# Altium PCB ODOS_PDB_prop_pcb.PcbDoc
Units mm, origin at the board's own origin, x right, y up, seen from the top; angles counter-clockwise.
Board outline 83.75 x 65.89 mm, 4 copper layers (Top Layer, Mid Layer 1, Mid Layer 2, Bottom Layer), stack 1.685 mm thick; 16 components, 2 nets, 37 pads, 149 vias.
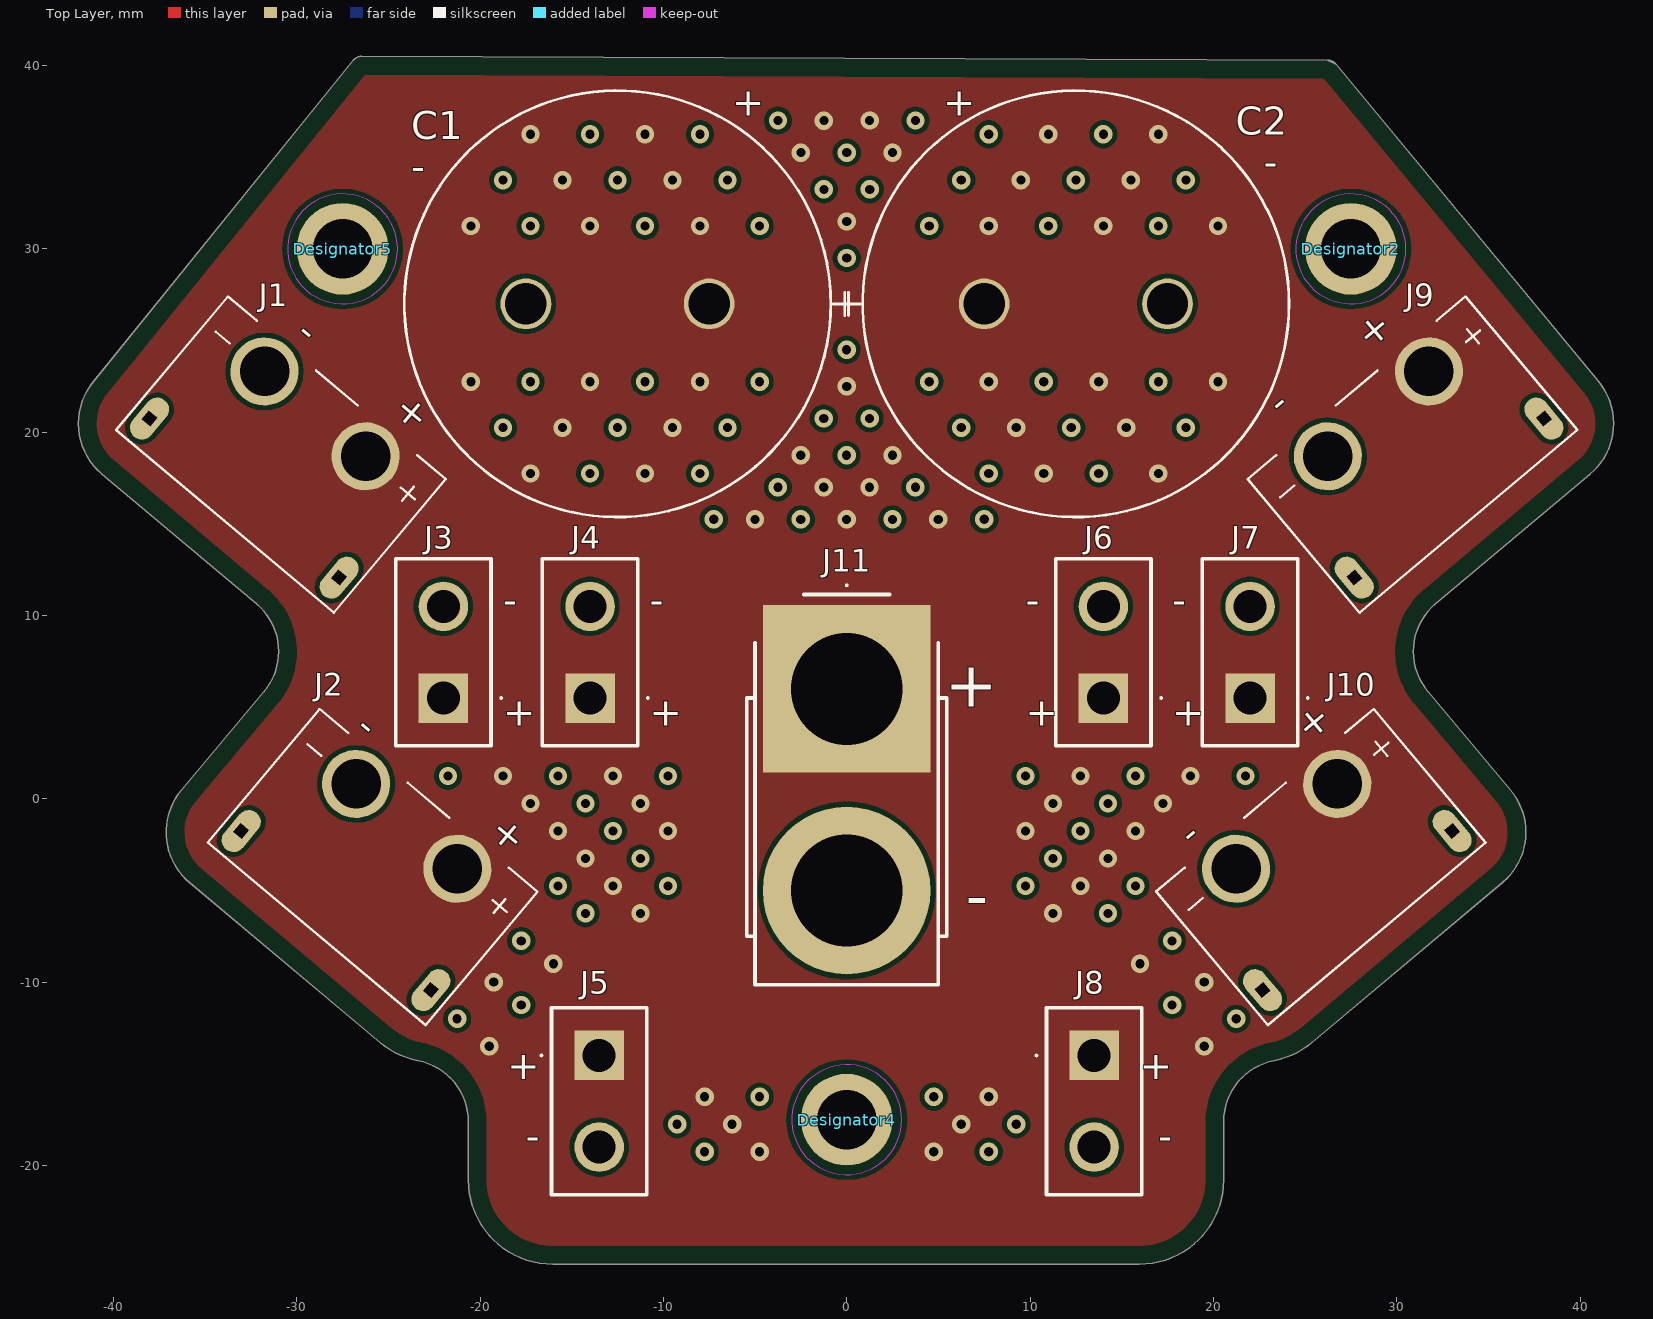
[diagram p0: Top Layer view]
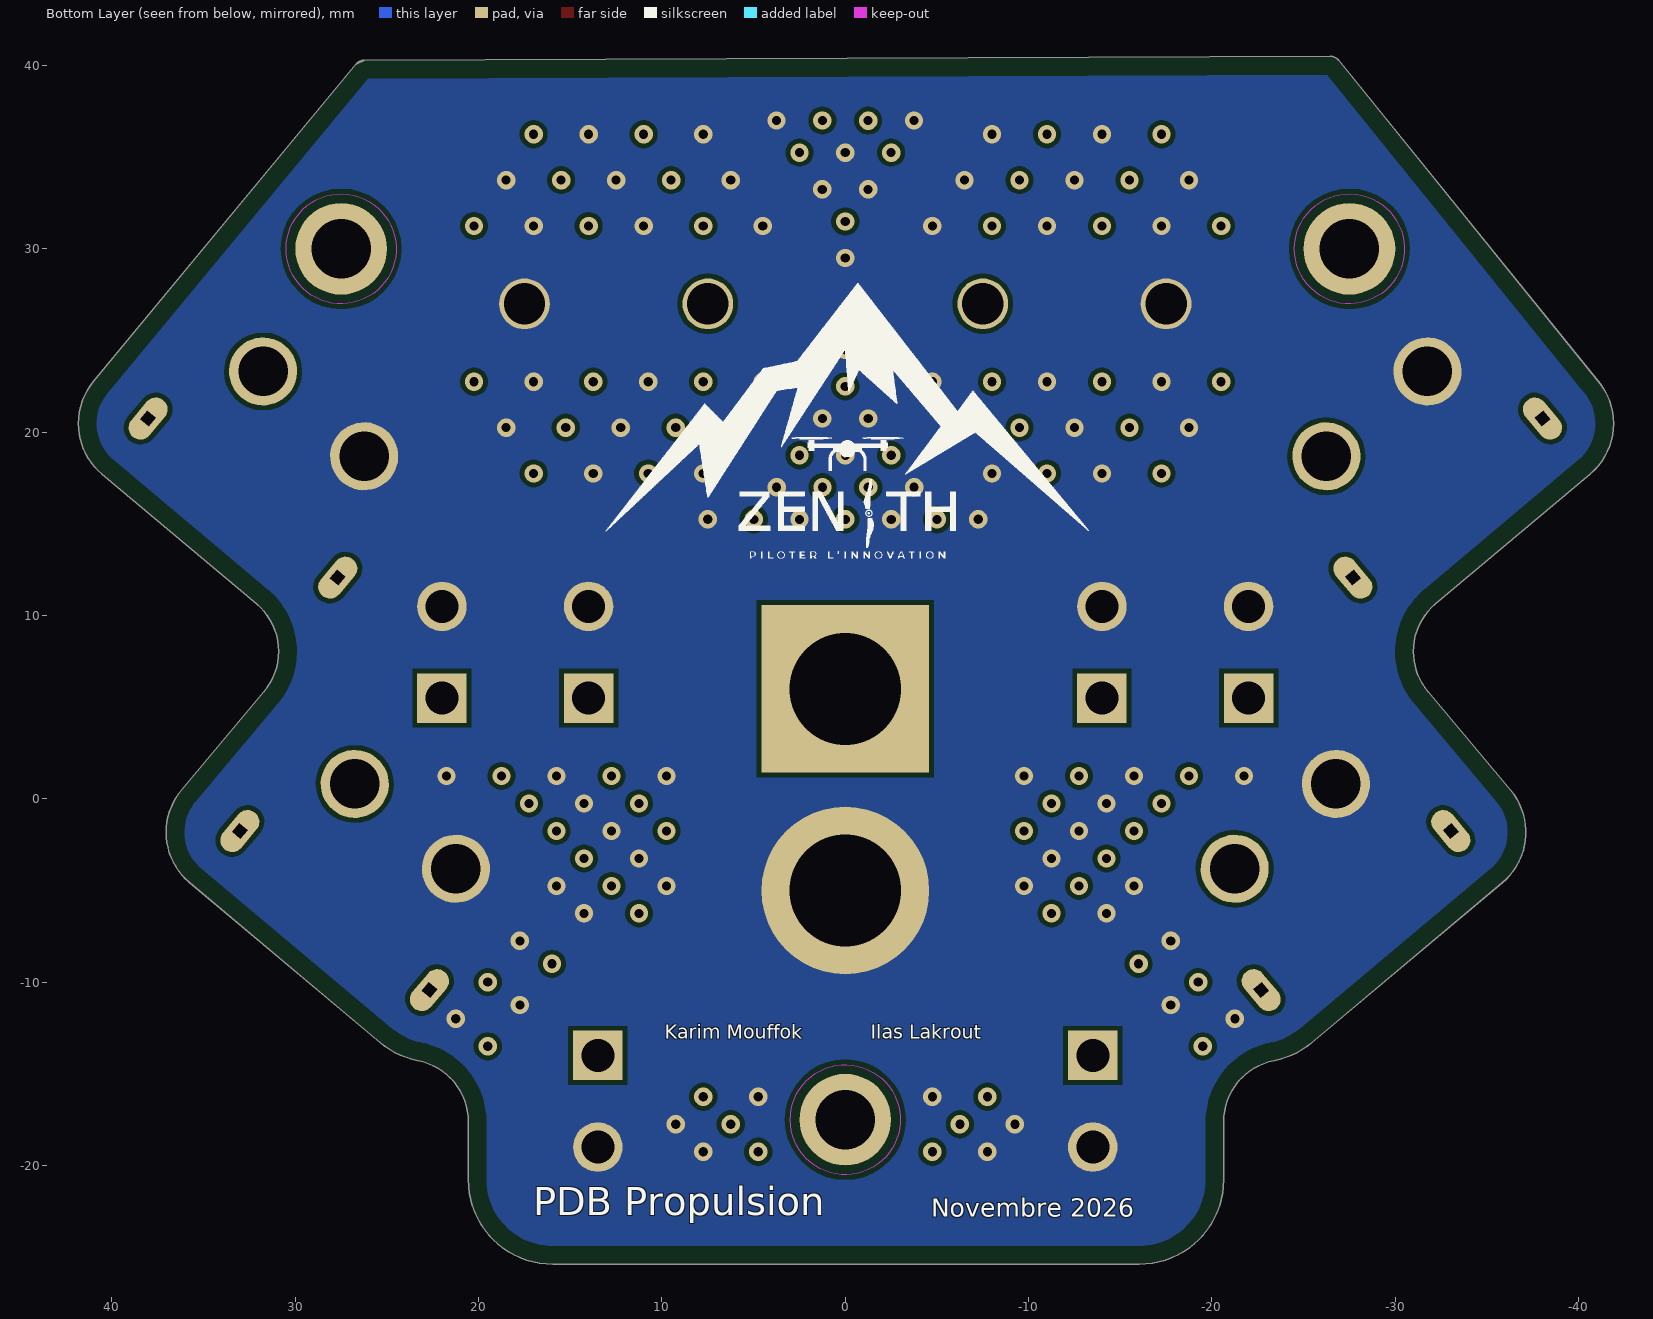
[diagram p1: Bottom Layer view, seen from below]
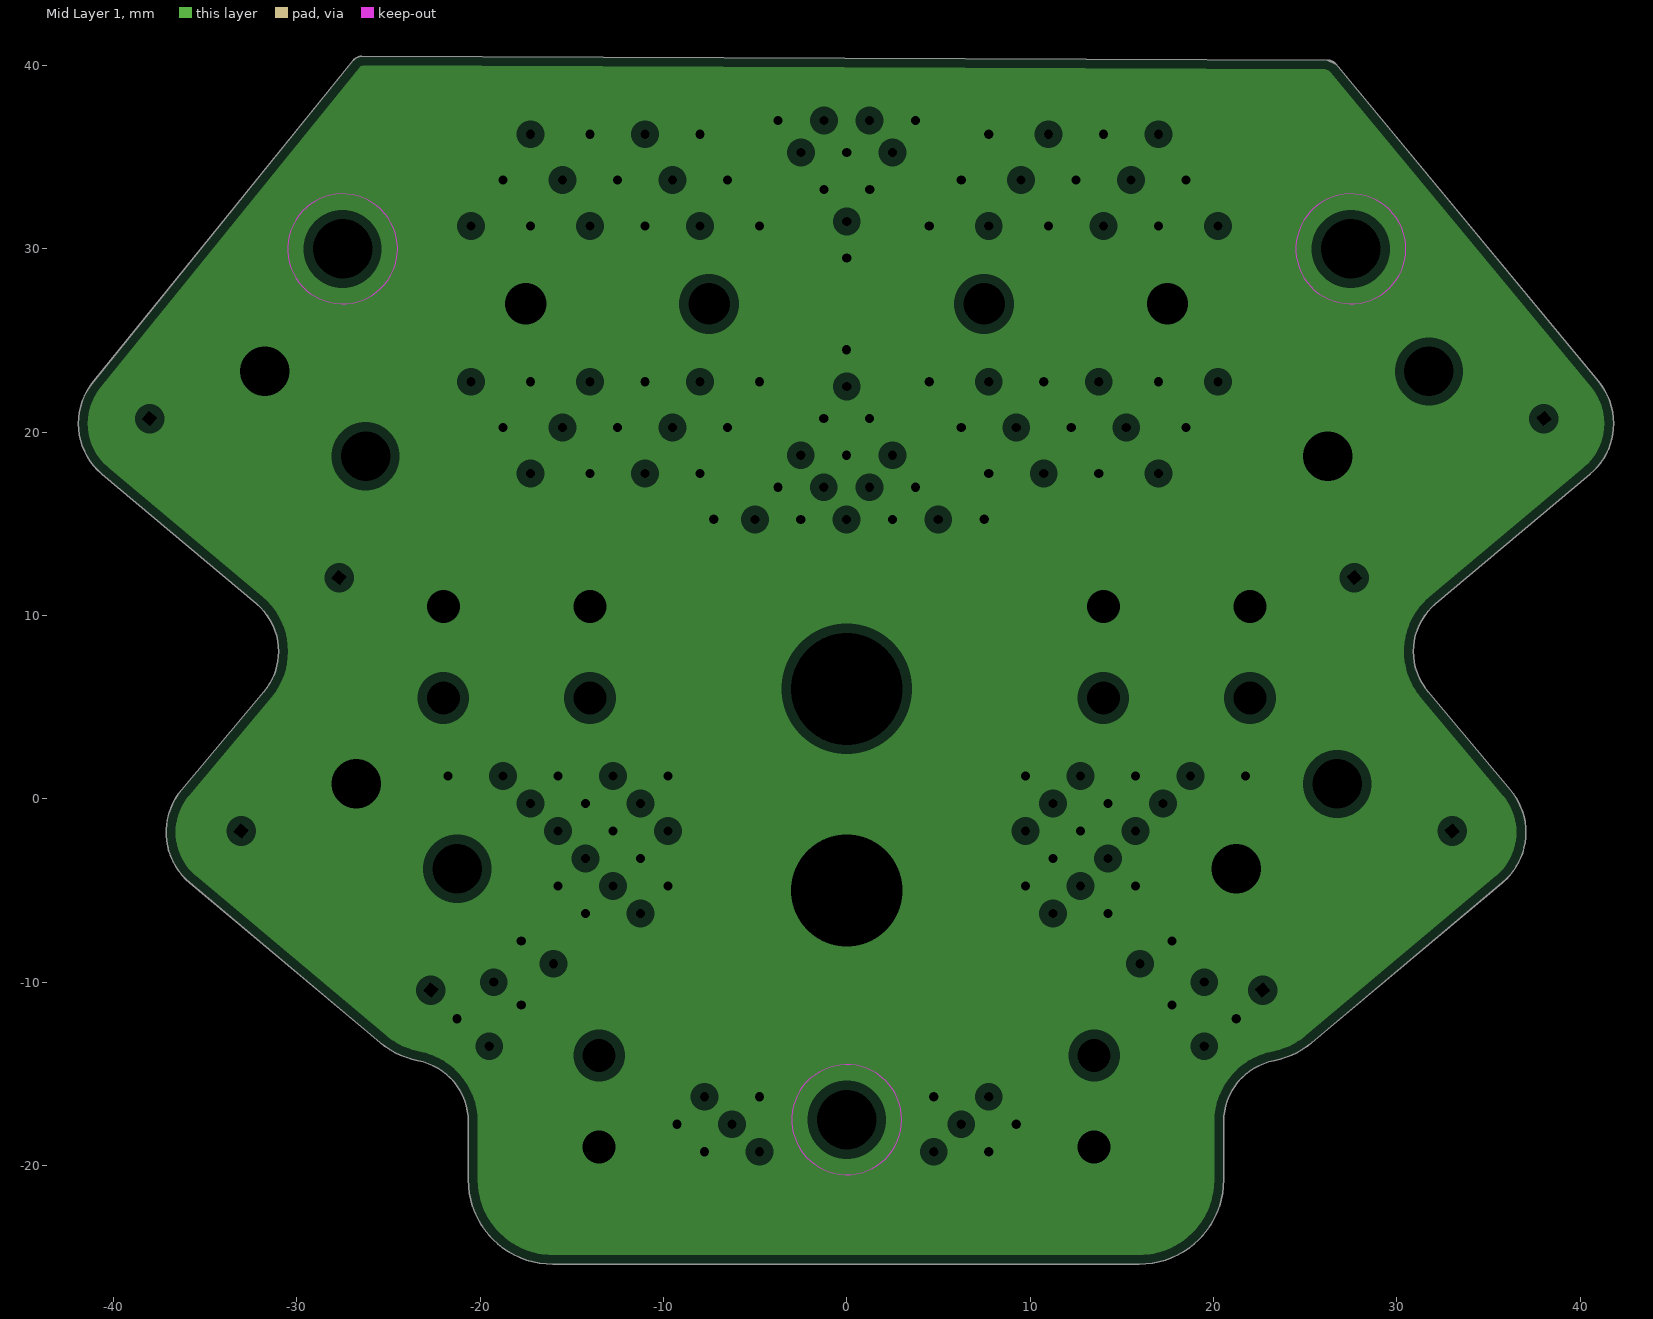
[diagram p2: Mid Layer 1, clearances drawn from the general rule]
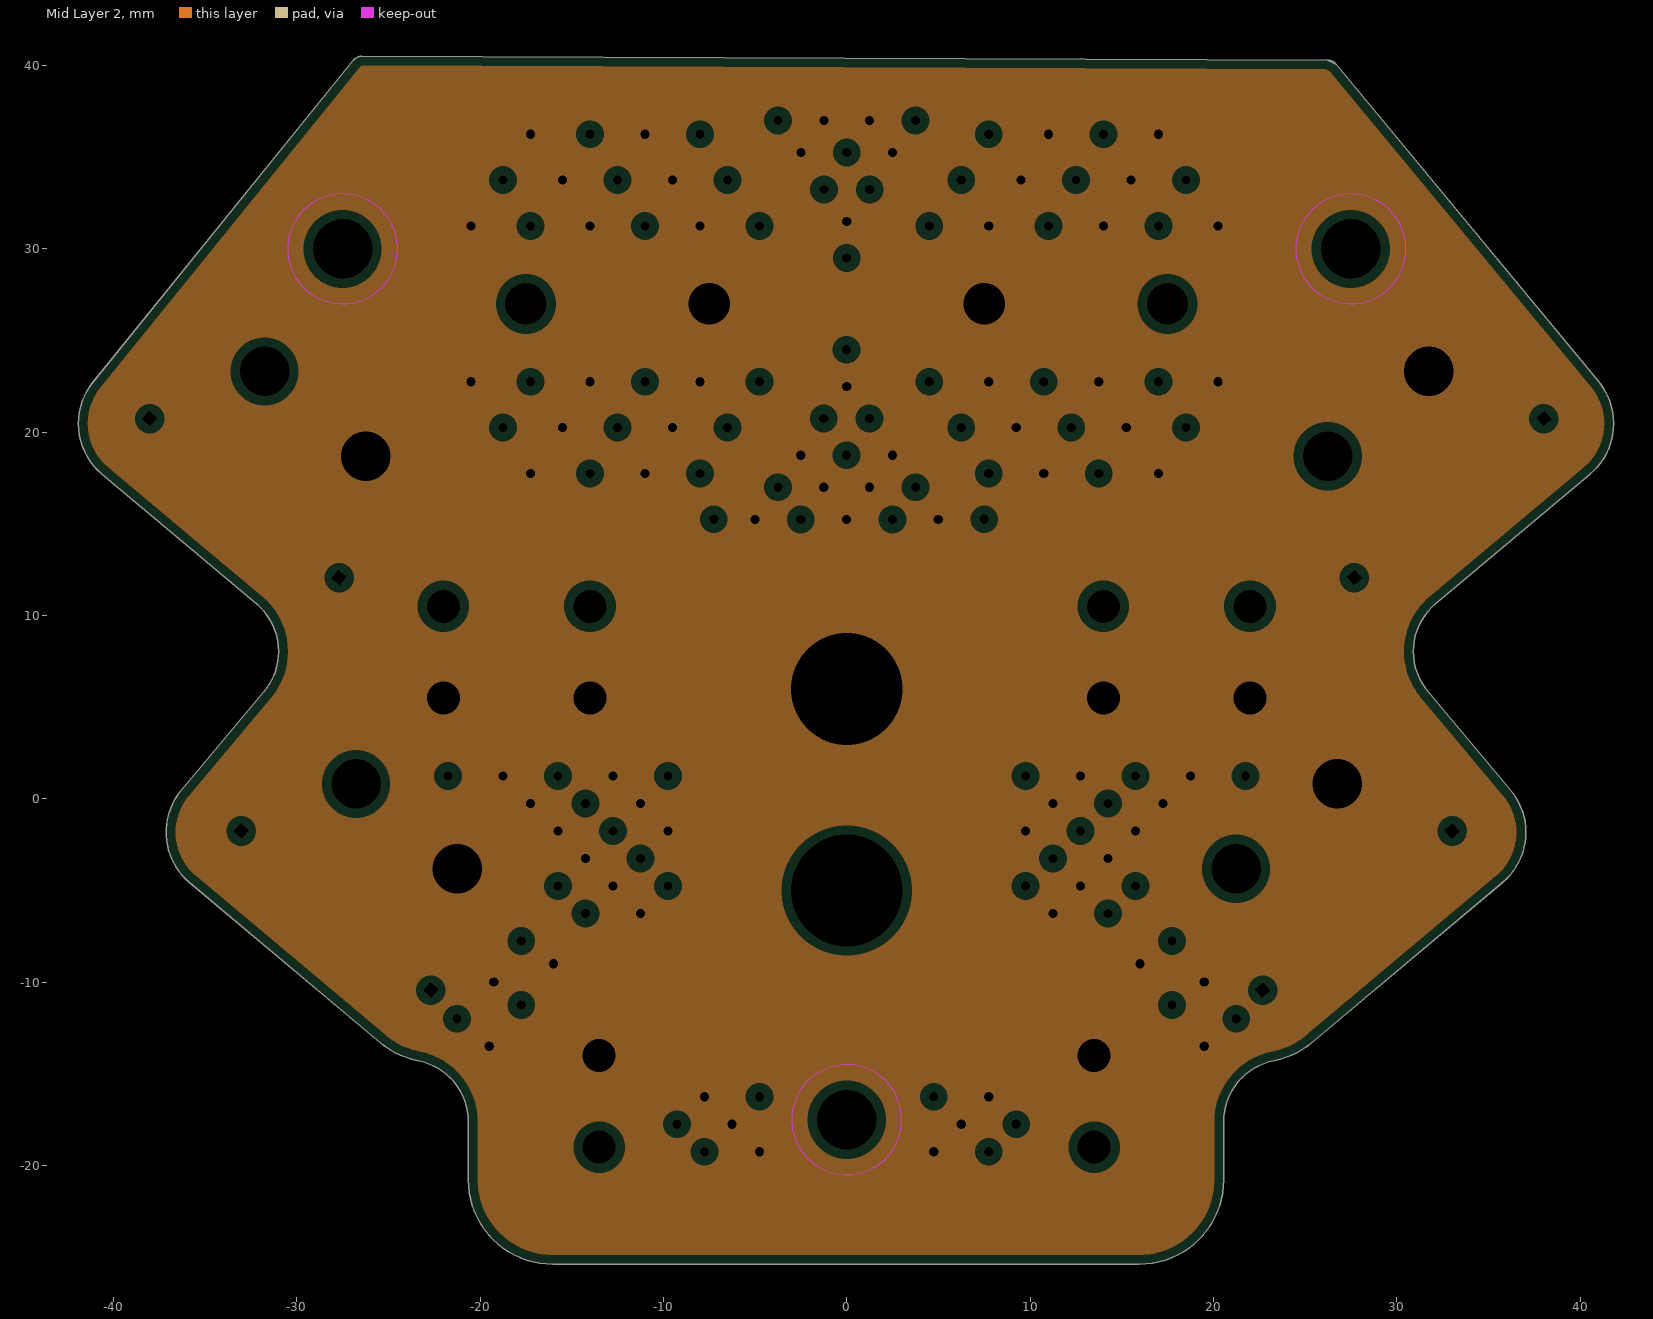
[diagram p3: Mid Layer 2, clearances drawn from the general rule]
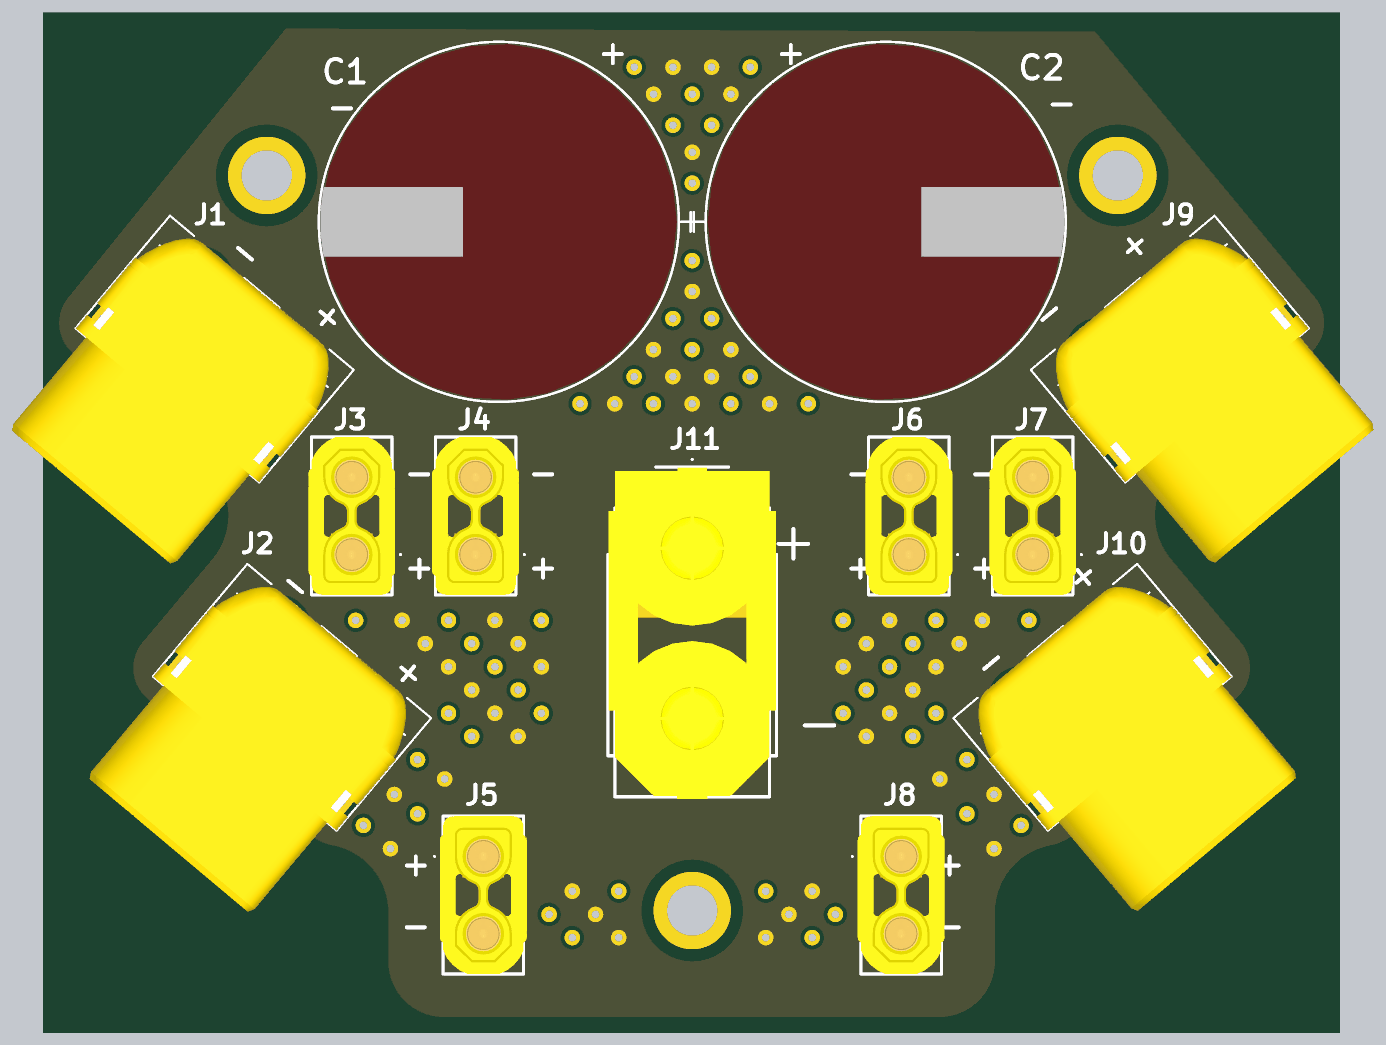
[diagram p4: 3D render of the assembled board from above, using the file's embedded part models]

## Layer stack, top to bottom
Top Solder: solder mask 0.0127, Solder Resist, Dk 3.8
Top Layer: signal copper 0.075
Dielectric 1: prepreg 0.2, 7628, Dk 4.6
Mid Layer 1: plane copper 0.035, net GND
Core: core 1.065, FR-4, Dk 4.5
Mid Layer 2: plane copper 0.035, net VCC
Dielectric 2: prepreg 0.2, 7628, Dk 4.6
Bottom Layer: signal copper 0.075
Bottom Solder: solder mask 0.0127, Solder Resist, Dk 3.8

## Board outline
-25.461,-13.288 ccw(c-22.504,-9.764) -23.388,-14.279 -23.386,-14.279 cw(c-24.038,-17.615) -20.639,-17.615 -20.639,-20.786 ccw(c-16.038,-20.786) -16.038,-25.387 15.962,-25.387 ccw(c15.962,-20.786) 20.562,-20.786 20.562,-17.615 cw(c23.962,-17.615) 23.31,-14.279 23.311,-14.279 ccw(c22.427,-9.764) 25.384,-13.288 35.76,-4.582 ccw(c33.446,-1.824) 37.046,-1.824 ccw(c33.446,-1.824) 36.204,0.49 31.704,5.853 31.703,5.854 cw(c34.308,8.038) 32.123,10.642 40.55,17.713 ccw(c38.235,20.471) 41.836,20.471 ccw(c38.235,20.471) 40.995,22.783 26.689,40.076 ccw(c26.226,39.694) 26.228,40.294 26.227,40.294 cw(c26.226,39.694) 26.688,40.077 26.227,40.294 -26.455,40.502 ccw(c-26.458,39.901) -26.925,40.279 -41.074,22.781 ccw(c-38.312,20.471) -40.626,17.713 -32.201,10.643 -32.2,10.642 cw(c-34.385,8.038) -30.986,8.038 cw(c-34.385,8.038) -31.781,5.853 -31.782,5.851 -36.28,0.49 ccw(c-33.522,-1.824) -35.837,-4.582

## Design rules (kind name [scope] priority, off if disabled: settings)
BoardOutlineClearance [All] p1: gap=1 ignorepadtopadclearanceinfootprint=FALSE
Clearance [All] p1: gap=0.254 ignorepadtopadclearanceinfootprint=TRUE
PlaneClearance [All] p1: clearance=0.508
PlaneConnect [All] p1: planeconnectstyle=Direct reliefexpansion=0.508 reliefentries=4 reliefconductorwidth=0.254 reliefairgap=0.254
PolygonConnect [All] p1: connectstyle=Direct reliefconductorwidth=0.254 reliefentries=4 polygonreliefangle="90 Angle" airgapwidth=0.254
RoutingVias [All] p1: holewidth=0.711 width=1.27 viastyle="Through Hole" minholewidth=0.711 minwidth=1.27 maxholewidth=0.711 maxwidth=1.27
SolderMaskExpansion [All] p1: expansion=0 istentingtop=FALSE
SupplyNets "Schematic Supply Nets_2" [InNet('VCC')] p1: voltage=0.000
SupplyNets "Schematic Supply Nets" [InNet('GND')] p2: voltage=0.000
Width [All] p1: maxlimit=0.254 minlimit=0.254 preferedwidth=0.254
28 further rules are at their usual default settings.

## Classes and differential pairs
component class ODOS_PDB_prop_schem: C1 C2 J1 J2 J3 J4 J5 J6 J7 J8 J9 J10 J11

## Components (designator, comment, footprint, x,y, rotation, side; value= is the part's Value field where it differs from the comment)
C1 "100MXG1000MEFCSN22X30" CAP_MXC_22x30_RUB -7.5,27 r180 top
C2 "100MXG1000MEFCSN22X30" CAP_MXC_22x30_RUB 7.5,27 r0 top
Designator2 "Comment" "MH - Footprint" 27.5,30 r0 top
Designator4 "Comment" "MH - Footprint" 0,-17.5 r0 top
Designator5 "Comment" "MH - Footprint" -27.5,30 r0 top
J1 "XT60PW-F" AMASS_XT60PW-F -29,21 r320 top
J2 "XT60PW-F" AMASS_XT60PW-F -24,-1.5 r320 top
J3 "XT30UPB-F" XT30UPBF -22,5.5 r0 top
J4 "XT30UPB-F" XT30UPBF -14,5.5 r0 top
J5 "XT30UPB-F" XT30UPBF -13.5,-14 r180 top
J6 "XT30UPB-F" XT30UPBF 14,5.5 r0 top
J7 "XT30UPB-F" XT30UPBF 22,5.5 r0 top
J8 "XT30UPB-F" XT30UPBF 13.5,-14 r180 top
J9 "XT60PW-F" AMASS_XT60PW-F 29,21 r40 top
J10 "XT60PW-F" AMASS_XT60PW-F 24,-1.5 r40 top
J11 "XT90PB-M" XT90PB-M 0,6 r90 top

## Footprints (in the part's own frame and the unit in brackets; to place one, negate y for a bottom-side part, rotate by r counter-clockwise, add the part's x,y. Pads: shape width x height; smd on the part's side, far side on the other; paste and mask are expansions set on the pad)
AMASS_XT60PW-F [mm]
  round 3.716 hole 2.7: 1(3.6,0) 2(-3.6,0)
  oval 1.3x2.6 hole 0.6 square: S1(-6.75,-6) S2(6.75,-6)
  silkscreen extent -7.75,-7.65 7.75,1.85, body extent -7.75,-15.35 7.75,1.85, height 8.4
CAP_MXC_22x30_RUB [mil]
  round 109 hole 89 paste-99999 mask+0: 1(0,0) 2(393.7,0)
  silkscreen extent -316,-458 655,458, body extent -256,-453 651,453, height 1261
"MH - Footprint" [mm]
  round 5 hole 3.25: MH(0,0)
  Keep-Out Layer circle w0.05: c0,0 r3
XT30UPBF [mm]
  rect 2.7x2.7 hole 1.8: 1(0,0)
  round 2.7 hole 1.8: 2(0,5)
  silkscreen extent -2.6,-2.6 3.2,7.6, body extent -2.81,-2.6 2.81,7.6, height 9.41
XT90PB-M [mm]
  rect 9.15x9.15 hole 6.1: 1(0,0)
  round 9.15 hole 6.1: 2(-11,0)
  silkscreen extent -16.15,-5.45 5.7,5.45, body extent -16.29,-5.4 5.11,5.4, height 20.95

## Part data
C1 C2: "No Description Available", Manufacturer_Name=Rubycon, Copyright="Copyright (C) 2026 Ultra Librarian. All rights reserved.", Manufacturer_Part_Number=100MXG1000MEFCSN22X30
J1 J2 J9 J10: "Socket DC Supply Connector Female", Package=Package, Availability="Not in stock", Check_prices=https://www.snapeda.com/parts/XT60PW-F/AMASS/view-part/?ref=eda, MF=AMASS, MP=XT60PW-F, Price=None, SnapEDA_Link=https://www.snapeda.com/parts/XT60PW-F/AMASS/view-part/?ref=snap
J3 J4 J5 J6 J7 J8: "Connector", Manufacturer_Name=Amass, Datasheet Link=https://www.tme.eu/Document/81f11ca924696756331f21b972812074/XT30PB-F.pdf, Height=9.4mm, Manufacturer_Part_Number=XT30UPB-F
J11: "Connector: DC supply; socket; XT90; male; PIN: 2; on PCBs; THT", Manufacturer_Name=Amass, ComponentLink1Description="Supplier link", ComponentLink1URL=https://www.tme.eu/en/details/xt90pb-m/dc-power-connectors/amass/, Datasheet Link=https://www.china-amass.com/biao/439.html, Geometry.Height=19.7mm, Manufacturer_Part_Number=XT90PB-M

## Via types
v1: diameter 1, hole 0.5, Top Layer to Bottom Layer, 149 vias

## Nets (pads, with @x,y where several pads share a name; then routed paths per layer and width w, separated by ;. In a path a pad name is that pad's centre, name@x,y a point inside that pad or via, vN(x,y) a via of type N, cw(c..) or ccw(c..) an arc to the next point about the centre after c; other vN are vias at no path point)
GND: C1.2 C2.2 J1.2 J2.2 J3.2 J4.2 J5.2 J6.2 J7.2 J8.2 J9.2 J10.2 J11.2
  other v1: -7.75,-19.25 7.75,-19.25 -9.25,-17.75 9.25,-17.75 -4.75,-16.25 4.75,-16.25 -21.25,-12 21.25,-12 -17.75,-11.25 17.75,-11.25 -17.75,-7.75 17.75,-7.75 -14.25,-6.25 14.25,-6.25 -15.75,-4.75 -9.75,-4.75 9.75,-4.75 15.75,-4.75 -11.25,-3.25 11.25,-3.25 -12.75,-1.75 12.75,-1.75 -14.25,-0.25 14.25,-0.25 -21.75,1.25 -15.75,1.25 -9.75,1.25 9.75,1.25 15.75,1.25 21.75,1.25 -7.25,15.25 -2.505,15.245 2.495,15.245 7.5,15.25 -3.755,16.995 3.745,16.995 -14,17.75 -8,17.75 7.75,17.75 13.75,17.75 -0.005,18.745 -18.75,20.25 -12.5,20.25 -6.5,20.25 6.25,20.25 12.25,20.25 18.5,20.25 -1.25,20.75 1.25,20.75 -17.25,22.75 -11,22.75 -4.75,22.75 4.5,22.75 10.75,22.75 17,22.75 -0.005,24.495 0,29.5 -17.25,31.25 -11,31.25 -4.75,31.25 4.5,31.25 11,31.25 17,31.25 -1.245,33.245 1.255,33.245 -18.75,33.75 -12.5,33.75 -6.5,33.75 6.25,33.75 12.5,33.75 18.5,33.75 0,35.25 -14,36.25 -8,36.25 7.75,36.25 14,36.25 -3.75,37 3.75,37
VCC: C1.1 C2.1 J1.1 J2.1 J3.1 J4.1 J5.1 J6.1 J7.1 J8.1 J9.1 J10.1 J11.1
  other v1: -4.75,-19.25 4.75,-19.25 -6.25,-17.75 6.25,-17.75 -7.75,-16.25 7.75,-16.25 -19.5,-13.5 19.5,-13.5 -19.25,-10 19.5,-10 -16,-9 16,-9 -11.25,-6.25 11.25,-6.25 -12.75,-4.75 12.75,-4.75 -14.25,-3.25 14.25,-3.25 -15.75,-1.75 -9.75,-1.75 9.75,-1.75 15.75,-1.75 -17.25,-0.25 -11.25,-0.25 11.25,-0.25 17.25,-0.25 -18.75,1.25 -12.75,1.25 12.75,1.25 18.75,1.25 -5.005,15.245 -0.005,15.245 4.995,15.245 -1.25,17 1.245,16.995 -17.25,17.75 -11,17.75 10.75,17.75 17,17.75 -2.505,18.745 2.495,18.745 -15.5,20.25 -9.5,20.25 9.25,20.25 15.25,20.25 0,22.5 -20.5,22.75 -14,22.75 -8,22.75 7.75,22.75 13.75,22.75 20.25,22.75 -20.5,31.25 -14,31.25 -8,31.25 7.75,31.25 14,31.25 20.25,31.25 0.005,31.495 -15.5,33.75 -9.5,33.75 9.5,33.75 15.5,33.75 -2.5,35.25 2.5,35.25 -17.25,36.25 -11,36.25 11,36.25 17,36.25 -1.245,36.995 1.25,37
pads on no net: Designator2.MH Designator4.MH Designator5.MH J1.S1 J1.S2 J2.S1 J2.S2 J9.S1 J9.S2 J10.S1 J10.S2

## Polygon pours and split planes (outlines as drawn)
GND on Bottom Layer "GND_L04_P001" (solid, pour order 1): -25.461,-13.288 ccw(c-22.504,-9.764) -23.388,-14.279 -23.386,-14.279 cw(c-24.038,-17.615) -20.639,-17.615 -20.639,-20.786 ccw(c-16.038,-20.786) -16.038,-25.387 15.962,-25.387 ccw(c15.962,-20.786) 20.562,-20.786 20.562,-17.615 cw(c23.962,-17.615) 23.31,-14.279 23.311,-14.279 ccw(c22.427,-9.764) 25.384,-13.288 35.76,-4.582 ccw(c33.446,-1.824) 37.046,-1.824 ccw(c33.446,-1.824) 36.204,0.49 31.704,5.853 31.703,5.854 cw(c34.308,8.038) 32.123,10.642 40.55,17.713 ccw(c38.235,20.471) 41.836,20.471 ccw(c38.235,20.471) 40.995,22.783 26.689,40.076 ccw(c26.226,39.694) 26.228,40.294 26.227,40.294 cw(c26.226,39.694) 26.688,40.077 26.227,40.294 -26.455,40.502 ccw(c-26.458,39.901) -26.925,40.279 -41.074,22.781 ccw(c-38.312,20.471) -40.626,17.713 -32.201,10.643 -32.2,10.642 cw(c-34.385,8.038) -30.986,8.038 cw(c-34.385,8.038) -31.781,5.853 -31.782,5.851 -36.28,0.49 ccw(c-33.522,-1.824) -35.837,-4.582
VCC on Top Layer "VCC_L01_P000" (solid, pour order 0): -25.461,-13.288 ccw(c-22.504,-9.764) -23.388,-14.279 -23.386,-14.279 cw(c-24.038,-17.615) -20.639,-17.615 -20.639,-20.786 ccw(c-16.038,-20.786) -16.038,-25.387 15.962,-25.387 ccw(c15.962,-20.786) 20.562,-20.786 20.562,-17.615 cw(c23.962,-17.615) 23.31,-14.279 23.311,-14.279 ccw(c22.427,-9.764) 25.384,-13.288 35.76,-4.582 ccw(c33.446,-1.824) 37.046,-1.824 ccw(c33.446,-1.824) 36.204,0.49 31.704,5.853 31.703,5.854 cw(c34.308,8.038) 32.123,10.642 40.55,17.713 ccw(c38.235,20.471) 41.836,20.471 ccw(c38.235,20.471) 40.995,22.783 26.689,40.076 ccw(c26.226,39.694) 26.228,40.294 26.227,40.294 cw(c26.226,39.694) 26.688,40.077 26.227,40.294 -26.455,40.502 ccw(c-26.458,39.901) -26.925,40.279 -41.074,22.781 ccw(c-38.312,20.471) -40.626,17.713 -32.201,10.643 -32.2,10.642 cw(c-34.385,8.038) -30.986,8.038 cw(c-34.385,8.038) -31.781,5.853 -31.782,5.851 -36.28,0.49 ccw(c-33.522,-1.824) -35.837,-4.582
VCC on Mid Layer 2 (split plane): 304 vertices, not listed, extent -41.404,-24.878 41.328,39.992
GND on Mid Layer 1 (split plane): 304 vertices, not listed, extent -41.404,-24.878 41.328,39.992

## Silkscreen, mask and mechanical layers (free items; w line width, h text height)
Top Overlay:
  text "+" at -6.246,37.25 h1.52
  text "+" at 5.254,37.25 h1.52
  text "-" at 22.754,33.992 h1.52
  text "-" at -23.746,33.742 h1.52
  text "+" at 29.055,26.587 h1.52 r220
  text "-" at -30.132,25.198 h1.52 r320
  text "-" at 23.541,22.209 h1.52 r220
  text "+" at -24.805,21.087 h1.52 r320
  text "-" at -18.746,10.092 h1.52
  text "-" at -10.746,10.092 h1.52
  text "-" at 9.754,10.092 h1.52
  text "-" at 17.754,10.092 h1.52
  text "+" at 8.246,7.163 h2.5 r180
  text "+" at 25.74,5.223 h1.52 r220
  text "+" at -18.746,4 h1.52
  text "+" at -10.746,4 h1.52
  text "+" at 9.754,4 h1.52
  text "+" at 17.754,4 h1.52
  text "-" at -26.882,3.698 h1.52 r320
  text "+" at -19.58,-1.918 h1.52 r320
  text "-" at 18.842,-2.68 h1.52 r40
  text "-" at 6.504,-6.496 h2.5
  text "+" at -16.754,-14 h1.52 r180
  text "+" at 17.746,-14 h1.52 r180
  text "-" at -16.754,-17.992 h1.52 r180
  text "-" at 17.746,-17.992 h1.52 r180
Bottom Overlay:
  drawing of 35 lines, arcs and shapes, not listed
  text "Ilas Lakrout" at -1.4,-13.1 h0.75
  text "Karim Mouffok" at 9.85,-13.1 h0.75
  text "PDB Propulsion" at 17.033,-22.713 h1.52
  text "Novembre 2026" at -4.7,-22.8 h1